# Altium PCB 1H-WSL007-2-1.PcbDoc (part 2 of 4)
Units mil, origin at the board's own origin, x right, y up, seen from the top; angles counter-clockwise.
Board outline 6030 x 4220 mil, 4 copper layers (Top Layer, Mid-Layer 1, Mid-Layer 2, Bottom Layer), stack 90.192 mil thick; 369 components, 15 nets, 801 pads, 1963 vias.
Unrouted connection lines stored in the file: 45.
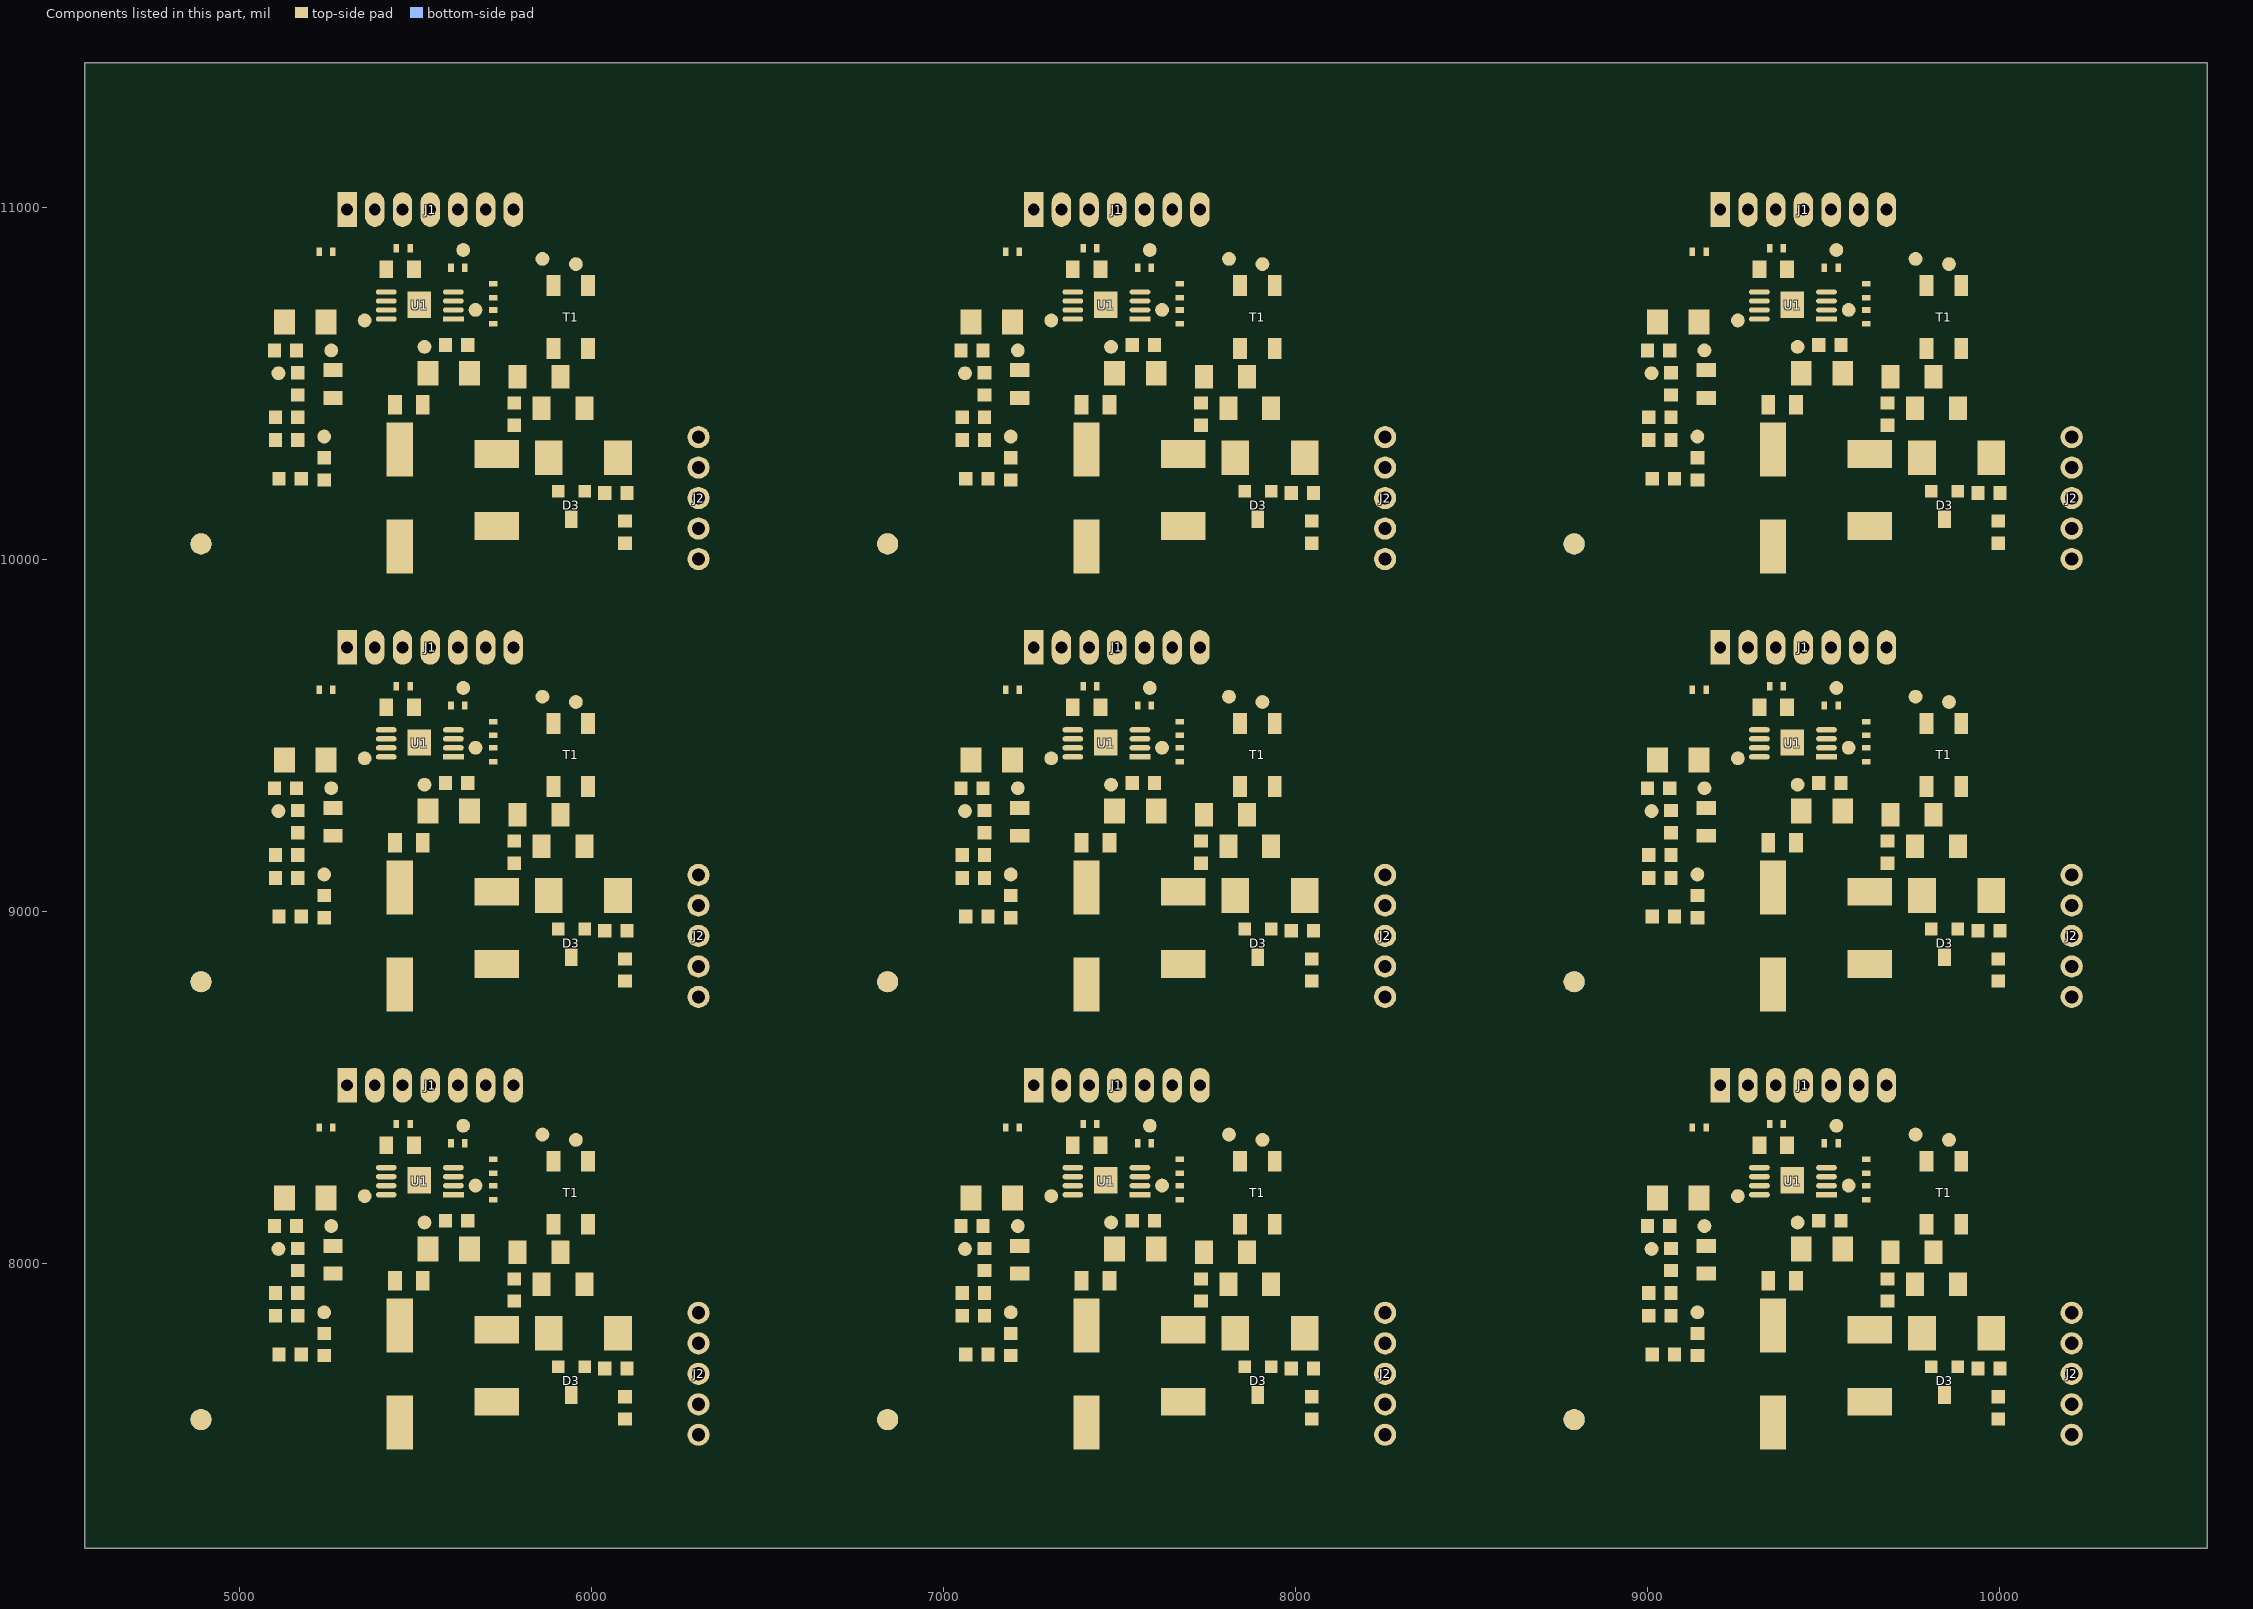
[diagram p4: the components of this part, seen from the top]

## Via types
v1: diameter 24, hole 12, Top Layer to Bottom Layer, tented both sides, 1918 vias
v2: diameter 16, hole 8, Top Layer to Bottom Layer, tented both sides, 45 vias

## Nets (pads, with @x,y where several pads share a name; then routed paths per layer and width w, separated by ;. In a path a pad name is that pad's centre, name@x,y a point inside that pad or via, vN(x,y) a via of type N, cw(c..) or ccw(c..) an arc to the next point about the centre after c; other vN are vias at no path point) (continued)
copper on no net: | length 56193.4
  Top Layer w10: 5111.5,8041.5 5165,8041.5 5161.5,8045 5161.5,8105.98 5175,8119.49 5175,8291.38 5264.69,8381.06 5264.69,8385 5264.69,8442.99 5282.48,8460.79 5305.04,8483.35 5305.04,8505 ; 5111.5,9285.59 5165,9285.59 5161.5,9289.09 5161.5,9350.08 5175,9363.58 5175,9535.47 5264.69,9625.16 5264.69,9629.09 5264.69,9687.09 5282.48,9704.88 5305.04,9727.44 5305.04,9749.09 ; 5111.5,10529.68 5165,10529.68 5161.5,10533.19 5161.5,10594.17 5175,10607.67 5175,10779.56 5264.69,10869.25 5264.69,10873.19 5264.69,10931.18 5282.48,10948.97 5305.04,10971.53 5305.04,10993.19 ; 5175,7740 5237.01,7740 5240,7737.01 ; 5175,8984.09 5237.01,8984.09 5240,8981.1 ; 5175,10228.19 5237.01,10228.19 5240,10225.19 ; 5240,7800 5240,7860 5175,7860 5165,7850 5165,7915 5165,7980 5175,7970 5265,7970 ; 5240,9044.09 5240,9104.09 5175,9104.09 5165,9094.09 5165,9159.09 5165,9224.09 5175,9214.09 5265,9214.09 ; 5240,10288.19 5240,10348.19 5175,10348.19 5165,10338.19 5165,10403.19 5165,10468.19 5175,10458.19 5265,10458.19 ; 5607.03,8219.71 5607.17,8219.85 5669.85,8219.85 5670,8220 5717.44,8220 5720,8222.56 5720,8255 ; 5607.03,9463.8 5607.17,9463.95 5669.85,9463.95 5670,9464.09 5717.44,9464.09 5720,9466.65 5720,9499.09 ; 5607.03,10707.89 5607.17,10708.04 5669.85,10708.04 5670,10708.19 5717.44,10708.19 5720,10710.75 5720,10743.19 ; 5620,8505 5620,8471.14 5635,8456.14 5635,8390 5637.34,8387.66 5637.34,8342.34 5639.69,8340 5670.43,8340 5716.06,8294.37 5720,8294.37 ; 5620,9749.09 5620,9715.23 5635,9700.23 5635,9634.09 5637.34,9631.75 5637.34,9586.44 5639.69,9584.09 5670.43,9584.09 5716.06,9538.46 5720,9538.46 ; 5620,10993.19 5620,10959.32 5635,10944.32 5635,10878.19 5637.34,10875.84 5637.34,10830.53 5639.69,10828.19 5670.43,10828.19 5716.06,10782.56 5720,10782.56 ; 5698.74,8505 5698.74,8483.35 5797.09,8385 5866.56,8385 5906.26,8345.3 5906.26,8303.82 5891.57,8289.13 ; 5698.74,9749.09 5698.74,9727.44 5797.09,9629.09 5866.56,9629.09 5906.26,9589.39 5906.26,9547.91 5891.57,9533.23 ; 5698.74,10993.19 5698.74,10971.53 5797.09,10873.19 5866.56,10873.19 5906.26,10833.48 5906.26,10792.01 5891.57,10777.32 ; 5777.48,8505 5784.66,8497.82 5784.66,8425.34 5805,8405 5874.13,8405 5965.47,8313.66 5975.31,8313.66 5990,8298.98 5990,8289.13 ; 5777.48,9749.09 5784.66,9741.91 5784.66,9669.43 5805,9649.09 5874.13,9649.09 5965.47,9557.75 5975.31,9557.75 5990,9543.07 5990,9533.23 ; 5777.48,10993.19 5784.66,10986.01 5784.66,10913.53 5805,10893.19 5874.13,10893.19 5965.47,10801.85 5975.31,10801.85 5990,10787.16 5990,10777.32 ; 5788.98,8030 5780,8021.02 5780,7955 5842.95,7955 5857.95,7940 ; 5788.98,9274.09 5780,9265.12 5780,9199.09 5842.95,9199.09 5857.95,9184.09 ; 5788.98,10518.19 5780,10509.21 5780,10443.19 5842.95,10443.19 5857.95,10428.19 ; 5891.57,8110 5891.57,8100.16 5919.13,8072.61 5919.13,8038.1 5911.02,8030 ; 5891.57,9354.09 5891.57,9344.25 5919.13,9316.7 5919.13,9282.2 5911.02,9274.09 ; 5891.57,10598.19 5891.57,10588.34 5919.13,10560.79 5919.13,10526.29 5911.02,10518.19 ; 5905,8030 5905,8028.15 5931.61,8001.54 5933.46,8001.54 5939.91,7995.09 5939.91,7900.53 5940.5,7899.94 5940.5,7740.5 5905,7705 5944.19,7665.81 6039.19,7665.81 6065,7640 6262.2,7640 6303.54,7598.66 ; 5905,9274.09 5905,9272.24 5931.61,9245.63 5933.46,9245.63 5939.91,9239.18 5939.91,9144.62 5940.5,9144.03 5940.5,8984.59 5905,8949.09 5944.19,8909.91 6039.19,8909.91 6065,8884.09 6262.2,8884.09 6303.54,8842.75 ; 5905,10518.19 5905,10516.34 5931.61,10489.72 5933.46,10489.72 5939.91,10483.28 5939.91,10388.72 5940.5,10388.13 5940.5,10228.69 5905,10193.19 5944.19,10154 6039.19,10154 6065,10128.19 6262.2,10128.19 6303.54,10086.85 ; 5990,8110 5990,8100.16 5959.41,8069.57 5959.41,7960.59 5980,7940 5960,7920 5960,7730 5990,7700 6037.01,7700 6037.01,7699.02 6050.71,7685.31 6051.69,7685.31 6077.01,7660 6265,7660 6290.28,7685.28 6303.54,7685.28 ; 5990,9354.09 5990,9344.25 5959.41,9313.66 5959.41,9204.68 5980,9184.09 5960,9164.09 5960,8974.09 5990,8944.09 6037.01,8944.09 6037.01,8943.11 6050.71,8929.41 6051.69,8929.41 6077.01,8904.09 6265,8904.09 6290.28,8929.37 6303.54,8929.37 ; 5990,10598.19 5990,10588.34 5959.41,10557.75 5959.41,10448.78 5980,10428.19 5960,10408.19 5960,10218.19 5990,10188.19 6037.01,10188.19 6037.01,10187.2 6050.71,10173.5 6051.69,10173.5 6077.01,10148.19 6265,10148.19 6290.28,10173.46 6303.54,10173.46 ; 7062.28,8041.5 7115.79,8041.5 7112.28,8045 7112.28,8105.98 7125.79,8119.49 7125.79,8291.38 7215.47,8381.06 7215.47,8385 7215.47,8442.99 7233.27,8460.79 7255.83,8483.35 7255.83,8505 ; 7062.28,9285.59 7115.79,9285.59 7112.28,9289.09 7112.28,9350.08 7125.79,9363.58 7125.79,9535.47 7215.47,9625.16 7215.47,9629.09 7215.47,9687.09 7233.27,9704.88 7255.83,9727.44 7255.83,9749.09 ; 7062.28,10529.68 7115.79,10529.68 7112.28,10533.19 7112.28,10594.17 7125.79,10607.68 7125.79,10779.56 7215.47,10869.25 7215.47,10873.19 7215.47,10931.18 7233.27,10948.97 7255.83,10971.53 7255.83,10993.19 ; 7125.79,7740 7187.8,7740 7190.79,7737.01 ; 7125.79,8984.09 7187.8,8984.09 7190.79,8981.1 ; 7125.79,10228.19 7187.8,10228.19 7190.79,10225.19 ; 7190.79,7800 7190.79,7860 7125.79,7860 7115.79,7850 7115.79,7915 7115.79,7980 7125.79,7970 7215.79,7970 ; 7190.79,9044.09 7190.79,9104.09 7125.79,9104.09 7115.79,9094.09 7115.79,9159.09 7115.79,9224.09 7125.79,9214.09 7215.79,9214.09 ; 7190.79,10288.19 7190.79,10348.19 7125.79,10348.19 7115.79,10338.19 7115.79,10403.19 7115.79,10468.19 7125.79,10458.19 7215.79,10458.19 ; 7557.81,8219.71 7557.96,8219.85 7620.64,8219.85 7620.79,8220 7668.23,8220 7670.79,8222.56 7670.79,8255 ; 7557.81,9463.8 7557.96,9463.95 7620.64,9463.95 7620.79,9464.09 7668.23,9464.09 7670.79,9466.65 7670.79,9499.09 ; 7557.81,10707.89 7557.96,10708.04 7620.64,10708.04 7620.79,10708.19 7668.23,10708.19 7670.79,10710.75 7670.79,10743.19 ; 7570.79,8505 7570.79,8471.14 7585.79,8456.14 7585.79,8390 7588.13,8387.66 7588.13,8342.34 7590.47,8340 7621.22,8340 7666.85,8294.37 7670.79,8294.37 ; 7570.79,9749.09 7570.79,9715.23 7585.79,9700.23 7585.79,9634.09 7588.13,9631.75 7588.13,9586.44 7590.47,9584.09 7621.22,9584.09 7666.85,9538.46 7670.79,9538.46 ; 7570.79,10993.19 7570.79,10959.32 7585.79,10944.32 7585.79,10878.19 7588.13,10875.84 7588.13,10830.53 7590.47,10828.19 7621.22,10828.19 7666.85,10782.56 7670.79,10782.56 ; 7649.53,8505 7649.53,8483.35 7747.87,8385 7817.34,8385 7857.05,8345.3 7857.05,8303.82 7842.36,8289.13 ; 7649.53,9749.09 7649.53,9727.44 7747.87,9629.09 7817.34,9629.09 7857.05,9589.39 7857.05,9547.91 7842.36,9533.23 ; 7649.53,10993.19 7649.53,10971.53 7747.87,10873.19 7817.34,10873.19 7857.05,10833.48 7857.05,10792.01 7842.36,10777.32 ; 7728.27,8505 7735.45,8497.82 7735.45,8425.34 7755.79,8405 7824.92,8405 7916.26,8313.66 7926.1,8313.66 7940.79,8298.98 7940.79,8289.13 ; 7728.27,9749.09 7735.45,9741.91 7735.45,9669.43 7755.79,9649.09 7824.92,9649.09 7916.26,9557.75 7926.1,9557.75 7940.79,9543.07 7940.79,9533.23 ; 7728.27,10993.19 7735.45,10986.01 7735.45,10913.53 7755.79,10893.19 7824.92,10893.19 7916.26,10801.85 7926.1,10801.85 7940.79,10787.16 7940.79,10777.32 ; 7739.76,8030 7730.79,8021.02 7730.79,7955 7793.74,7955 7808.74,7940 ; 7739.76,9274.09 7730.79,9265.12 7730.79,9199.09 7793.74,9199.09 7808.74,9184.09 ; 7739.76,10518.19 7730.79,10509.21 7730.79,10443.19 7793.74,10443.19 7808.74,10428.19 ; 7842.36,8110 7842.36,8100.16 7869.91,8072.61 7869.91,8038.1 7861.81,8030 ; 7842.36,9354.09 7842.36,9344.25 7869.91,9316.7 7869.91,9282.2 7861.81,9274.09 ; 7842.36,10598.19 7842.36,10588.34 7869.91,10560.79 7869.91,10526.29 7861.81,10518.19 ; 7855.79,8030 7855.79,8028.15 7882.4,8001.54 7884.25,8001.54 7890.7,7995.09 7890.7,7900.53 7891.29,7899.94 7891.29,7740.5 7855.79,7705 7894.97,7665.81 7989.97,7665.81 8015.79,7640 8212.99,7640 8254.33,7598.66 ; 7855.79,9274.09 7855.79,9272.24 7882.4,9245.63 7884.25,9245.63 7890.7,9239.18 7890.7,9144.62 7891.29,9144.03 7891.29,8984.59 7855.79,8949.09 7894.97,8909.91 7989.97,8909.91 8015.79,8884.09 8212.99,8884.09 8254.33,8842.75 ; 7855.79,10518.19 7855.79,10516.34 7882.4,10489.72 7884.25,10489.72 7890.7,10483.28 7890.7,10388.72 7891.29,10388.13 7891.29,10228.69 7855.79,10193.19 7894.97,10154 7989.97,10154 8015.79,10128.19 8212.99,10128.19 8254.33,10086.85 ; 7940.79,8110 7940.79,8100.16 7910.2,8069.57 7910.2,7960.59 7930.79,7940 7910.79,7920 7910.79,7730 7940.79,7700 7987.8,7700 7987.8,7699.02 8001.5,7685.31 8002.48,7685.31 8027.8,7660 8215.79,7660 8241.06,7685.28 8254.33,7685.28 ; 7940.79,9354.09 7940.79,9344.25 7910.2,9313.66 7910.2,9204.68 7930.79,9184.09 7910.79,9164.09 7910.79,8974.09 7940.79,8944.09 7987.8,8944.09 7987.8,8943.11 8001.5,8929.41 8002.48,8929.41 8027.8,8904.09 8215.79,8904.09 8241.06,8929.37 8254.33,8929.37 ; 7940.79,10598.19 7940.79,10588.34 7910.2,10557.75 7910.2,10448.78 7930.79,10428.19 7910.79,10408.19 7910.79,10218.19 7940.79,10188.19 7987.8,10188.19 7987.8,10187.2 8001.5,10173.5 8002.48,10173.5 8027.8,10148.19 8215.79,10148.19 8241.06,10173.46 8254.33,10173.46 ; 9013.07,8041.5 9066.57,8041.5 9063.07,8045 9063.07,8105.98 9076.57,8119.49 9076.57,8291.38 9166.26,8381.06 9166.26,8385 9166.26,8442.99 9184.06,8460.79 9206.61,8483.35 9206.61,8505 ; 9013.07,9285.59 9066.57,9285.59 9063.07,9289.09 9063.07,9350.08 9076.57,9363.58 9076.57,9535.47 9166.26,9625.16 9166.26,9629.09 9166.26,9687.09 9184.06,9704.88 9206.61,9727.44 9206.61,9749.09 ; 9013.07,10529.68 9066.57,10529.68 9063.07,10533.19 9063.07,10594.17 9076.57,10607.68 9076.57,10779.56 9166.26,10869.25 9166.26,10873.19 9166.26,10931.18 9184.06,10948.97 9206.61,10971.53 9206.61,10993.19 ; 9076.57,7740 9138.58,7740 9141.57,7737.01 ; 9076.57,8984.09 9138.58,8984.09 9141.57,8981.1 ; 9076.57,10228.19 9138.58,10228.19 9141.57,10225.19 ; 9141.57,7800 9141.57,7860 9076.57,7860 9066.57,7850 9066.57,7915 9066.57,7980 9076.57,7970 9166.57,7970 ; 9141.57,9044.09 9141.57,9104.09 9076.57,9104.09 9066.57,9094.09 9066.57,9159.09 9066.57,9224.09 9076.57,9214.09 9166.57,9214.09 ; 9141.57,10288.19 9141.57,10348.19 9076.57,10348.19 9066.57,10338.19 9066.57,10403.19 9066.57,10468.19 9076.57,10458.19 9166.57,10458.19 ; 9508.6,8219.71 9508.75,8219.85 9571.43,8219.85 9571.57,8220 9619.02,8220 9621.57,8222.56 9621.57,8255 ; 9508.6,9463.8 9508.75,9463.95 9571.43,9463.95 9571.57,9464.09 9619.02,9464.09 9621.57,9466.65 9621.57,9499.09 ; 9508.6,10707.89 9508.75,10708.04 9571.43,10708.04 9571.57,10708.19 9619.02,10708.19 9621.57,10710.75 9621.57,10743.19 ; 9521.57,8505 9521.57,8471.14 9536.57,8456.14 9536.57,8390 9538.92,8387.66 9538.92,8342.34 9541.26,8340 9572.01,8340 9617.64,8294.37 9621.57,8294.37 ; 9521.57,9749.09 9521.57,9715.23 9536.57,9700.23 9536.57,9634.09 9538.92,9631.75 9538.92,9586.44 9541.26,9584.09 9572.01,9584.09 9617.64,9538.46 9621.57,9538.46 ; 9521.57,10993.19 9521.57,10959.32 9536.57,10944.32 9536.57,10878.19 9538.92,10875.84 9538.92,10830.53 9541.26,10828.19 9572.01,10828.19 9617.64,10782.56 9621.57,10782.56 ; 9600.32,8505 9600.32,8483.35 9698.66,8385 9768.13,8385 9807.83,8345.3 9807.83,8303.82 9793.15,8289.13 ; 9600.32,9749.09 9600.32,9727.44 9698.66,9629.09 9768.13,9629.09 9807.83,9589.39 9807.83,9547.91 9793.15,9533.23 ; 9600.32,10993.19 9600.32,10971.53 9698.66,10873.19 9768.13,10873.19 9807.83,10833.48 9807.83,10792.01 9793.15,10777.32 ; 9679.06,8505 9686.24,8497.82 9686.24,8425.34 9706.57,8405 9775.71,8405 9867.05,8313.66 9876.89,8313.66 9891.57,8298.98 9891.57,8289.13 ; 9679.06,9749.09 9686.24,9741.91 9686.24,9669.43 9706.57,9649.09 9775.71,9649.09 9867.05,9557.75 9876.89,9557.75 9891.57,9543.07 9891.57,9533.23 ; 9679.06,10993.19 9686.24,10986.01 9686.24,10913.53 9706.57,10893.19 9775.71,10893.19 9867.05,10801.85 9876.89,10801.85 9891.57,10787.16 9891.57,10777.32 ; 9690.55,8030 9681.57,8021.02 9681.57,7955 9744.53,7955 9759.53,7940 ; 9690.55,9274.09 9681.57,9265.12 9681.57,9199.09 9744.53,9199.09 9759.53,9184.09 ; 9690.55,10518.19 9681.57,10509.21 9681.57,10443.19 9744.53,10443.19 9759.53,10428.19 ; 9793.15,8110 9793.15,8100.16 9820.7,8072.61 9820.7,8038.1 9812.6,8030 ; 9793.15,9354.09 9793.15,9344.25 9820.7,9316.7 9820.7,9282.2 9812.6,9274.09 ; 9793.15,10598.19 9793.15,10588.34 9820.7,10560.79 9820.7,10526.29 9812.6,10518.19 ; 9806.57,8030 9806.57,8028.15 9833.19,8001.54 9835.04,8001.54 9841.48,7995.09 9841.48,7900.53 9842.07,7899.94 9842.07,7740.5 9806.57,7705 9845.76,7665.81 9940.76,7665.81 9966.57,7640 10163.78,7640 10205.12,7598.66 ; 9806.57,9274.09 9806.57,9272.24 9833.19,9245.63 9835.04,9245.63 9841.48,9239.18 9841.48,9144.62 9842.07,9144.03 9842.07,8984.59 9806.57,8949.09 9845.76,8909.91 9940.76,8909.91 9966.57,8884.09 10163.78,8884.09 10205.12,8842.75 ; 9806.57,10518.19 9806.57,10516.34 9833.19,10489.72 9835.04,10489.72 9841.48,10483.28 9841.48,10388.72 9842.07,10388.13 9842.07,10228.69 9806.57,10193.19 9845.76,10154 9940.76,10154 9966.57,10128.19 10163.78,10128.19 10205.12,10086.85 ; 9891.57,8110 9891.57,8100.16 9860.98,8069.57 9860.98,7960.59 9881.57,7940 9861.57,7920 9861.57,7730 9891.57,7700 9938.58,7700 9938.58,7699.02 9952.28,7685.31 9953.27,7685.31 9978.58,7660 10166.57,7660 10191.85,7685.28 10205.12,7685.28 ; 9891.57,9354.09 9891.57,9344.25 9860.98,9313.66 9860.98,9204.68 9881.57,9184.09 9861.57,9164.09 9861.57,8974.09 9891.57,8944.09 9938.58,8944.09 9938.58,8943.11 9952.28,8929.41 9953.27,8929.41 9978.58,8904.09 10166.57,8904.09 10191.85,8929.37 10205.12,8929.37 ; 9891.57,10598.19 9891.57,10588.34 9860.98,10557.75 9860.98,10448.78 9881.57,10428.19 9861.57,10408.19 9861.57,10218.19 9891.57,10188.19 9938.58,10188.19 9938.58,10187.2 9952.28,10173.5 9953.27,10173.5 9978.58,10148.19 10166.57,10148.19 10191.85,10173.46 10205.12,10173.46
  Top Layer w15: 5416.28,8194.1 5359.1,8194.1 5355,8190 5355,8268.82 5416.26,8330.08 5416.26,8339.92 5445.31,8368.98 5445.31,8455.29 5462.52,8472.49 5462.52,8505 ; 5416.28,9438.19 5359.1,9438.19 5355,9434.09 5355,9512.91 5416.26,9574.17 5416.26,9584.01 5445.31,9613.07 5445.31,9699.38 5462.52,9716.58 5462.52,9749.09 ; 5416.28,10682.28 5359.1,10682.28 5355,10678.19 5355,10757.01 5416.26,10818.27 5416.26,10828.11 5445.31,10857.16 5445.31,10943.47 5462.52,10960.68 5462.52,10993.19 ; 7367.07,8194.1 7309.89,8194.1 7305.79,8190 7305.79,8268.82 7367.05,8330.08 7367.05,8339.92 7396.1,8368.98 7396.1,8455.29 7413.31,8472.49 7413.31,8505 ; 7367.07,9438.19 7309.89,9438.19 7305.79,9434.09 7305.79,9512.91 7367.05,9574.17 7367.05,9584.01 7396.1,9613.07 7396.1,9699.38 7413.31,9716.58 7413.31,9749.09 ; 7367.07,10682.28 7309.89,10682.28 7305.79,10678.19 7305.79,10757.01 7367.05,10818.27 7367.05,10828.11 7396.1,10857.16 7396.1,10943.47 7413.31,10960.68 7413.31,10993.19 ; 9317.86,8194.1 9260.67,8194.1 9256.57,8190 9256.57,8268.82 9317.83,8330.08 9317.83,8339.92 9346.89,8368.98 9346.89,8455.29 9364.09,8472.49 9364.09,8505 ; 9317.86,9438.19 9260.67,9438.19 9256.57,9434.09 9256.57,9512.91 9317.83,9574.17 9317.83,9584.01 9346.89,9613.07 9346.89,9699.38 9364.09,9716.58 9364.09,9749.09 ; 9317.86,10682.28 9260.67,10682.28 9256.57,10678.19 9256.57,10757.01 9317.83,10818.27 9317.83,10828.11 9346.89,10857.16 9346.89,10943.47 9364.09,10960.68 9364.09,10993.19
  Top Layer w20: 5265,8048.74 5262.5,8051.24 5262.5,8102.5 5260,8105 5256.29,8108.71 5256.29,8173.71 5245,8185 5245,8260 5340,8355 5340,8430 5367.86,8457.86 5367.86,8457.93 5383.78,8473.84 5383.78,8505 ; 5265,9292.83 5262.5,9295.33 5262.5,9346.59 5260,9349.09 5256.29,9352.8 5256.29,9417.8 5245,9429.09 5245,9504.09 5340,9599.09 5340,9674.09 5367.86,9701.96 5367.86,9702.02 5383.78,9717.94 5383.78,9749.09 ; 5265,10536.93 5262.5,10539.43 5262.5,10590.69 5260,10593.19 5256.29,10596.89 5256.29,10661.89 5245,10673.19 5245,10748.19 5340,10843.19 5340,10918.19 5367.86,10946.05 5367.86,10946.11 5383.78,10962.03 5383.78,10993.19 ; 5520,7950 5527.5,7957.5 5527.5,8032.5 5535,8040 5528.71,8046.29 5528.71,8111.29 5525,8115 5527.5,8117.5 5582.5,8117.5 5585,8120 5585,8120.98 5607.03,8143.01 5607.03,8191.6 ; 5520,9194.09 5527.5,9201.59 5527.5,9276.59 5535,9284.09 5528.71,9290.39 5528.71,9355.39 5525,9359.09 5527.5,9361.59 5582.5,9361.59 5585,9364.09 5585,9365.08 5607.03,9387.1 5607.03,9435.69 ; 5520,10438.19 5527.5,10445.69 5527.5,10520.69 5535,10528.19 5528.71,10534.48 5528.71,10599.48 5525,10603.19 5527.5,10605.69 5582.5,10605.69 5585,10608.19 5585,10609.17 5607.03,10631.2 5607.03,10679.78 ; 7215.79,8048.74 7213.29,8051.24 7213.29,8102.5 7210.79,8105 7207.08,8108.71 7207.08,8173.71 7195.79,8185 7195.79,8260 7290.79,8355 7290.79,8430 7318.65,8457.86 7318.65,8457.93 7334.57,8473.84 7334.57,8505 ; 7215.79,9292.83 7213.29,9295.33 7213.29,9346.59 7210.79,9349.09 7207.08,9352.8 7207.08,9417.8 7195.79,9429.09 7195.79,9504.09 7290.79,9599.09 7290.79,9674.09 7318.65,9701.96 7318.65,9702.02 7334.57,9717.94 7334.57,9749.09 ; 7215.79,10536.93 7213.29,10539.43 7213.29,10590.69 7210.79,10593.19 7207.08,10596.89 7207.08,10661.89 7195.79,10673.19 7195.79,10748.19 7290.79,10843.19 7290.79,10918.19 7318.65,10946.05 7318.65,10946.11 7334.57,10962.03 7334.57,10993.19 ; 7470.79,7950 7478.29,7957.5 7478.29,8032.5 7485.79,8040 7479.49,8046.29 7479.49,8111.29 7475.79,8115 7478.29,8117.5 7533.29,8117.5 7535.79,8120 7535.79,8120.98 7557.81,8143.01 7557.81,8191.6 ; 7470.79,9194.09 7478.29,9201.59 7478.29,9276.59 7485.79,9284.09 7479.49,9290.39 7479.49,9355.39 7475.79,9359.09 7478.29,9361.59 7533.29,9361.59 7535.79,9364.09 7535.79,9365.08 7557.81,9387.1 7557.81,9435.69 ; 7470.79,10438.19 7478.29,10445.69 7478.29,10520.69 7485.79,10528.19 7479.49,10534.48 7479.49,10599.48 7475.79,10603.19 7478.29,10605.69 7533.29,10605.69 7535.79,10608.19 7535.79,10609.17 7557.81,10631.2 7557.81,10679.78 ; 9166.57,8048.74 9164.07,8051.24 9164.07,8102.5 9161.57,8105 9157.87,8108.71 9157.87,8173.71 9146.57,8185 9146.57,8260 9241.57,8355 9241.57,8430 9269.44,8457.86 9269.44,8457.93 9285.35,8473.84 9285.35,8505 ; 9166.57,9292.83 9164.07,9295.33 9164.07,9346.59 9161.57,9349.09 9157.87,9352.8 9157.87,9417.8 9146.57,9429.09 9146.57,9504.09 9241.57,9599.09 9241.57,9674.09 9269.44,9701.96 9269.44,9702.02 9285.35,9717.94 9285.35,9749.09 ; 9166.57,10536.93 9164.07,10539.43 9164.07,10590.69 9161.57,10593.19 9157.87,10596.89 9157.87,10661.89 9146.57,10673.19 9146.57,10748.19 9241.57,10843.19 9241.57,10918.19 9269.44,10946.05 9269.44,10946.11 9285.35,10962.03 9285.35,10993.19 ; 9421.57,7950 9429.07,7957.5 9429.07,8032.5 9436.57,8040 9430.28,8046.29 9430.28,8111.29 9426.57,8115 9429.07,8117.5 9484.07,8117.5 9486.57,8120 9486.57,8120.98 9508.6,8143.01 9508.6,8191.6 ; 9421.57,9194.09 9429.07,9201.59 9429.07,9276.59 9436.57,9284.09 9430.28,9290.39 9430.28,9355.39 9426.57,9359.09 9429.07,9361.59 9484.07,9361.59 9486.57,9364.09 9486.57,9365.08 9508.6,9387.1 9508.6,9435.69 ; 9421.57,10438.19 9429.07,10445.69 9429.07,10520.69 9436.57,10528.19 9430.28,10534.48 9430.28,10599.48 9426.57,10603.19 9429.07,10605.69 9484.07,10605.69 9486.57,10608.19 9486.57,10609.17 9508.6,10631.2 9508.6,10679.78
  Top Layer w30: 5265,7970 5421.26,7970 5428.7,7962.56 5436.57,7962.56 5441.26,7957.87 5441.26,7950 5445.94,7945.31 5445.94,7831.85 5455,7822.8 5467.26,7810.53 5730.15,7810.53 5867.62,7810.53 5878.15,7800 ; 5265,9214.09 5421.26,9214.09 5428.7,9206.65 5436.57,9206.65 5441.26,9201.97 5441.26,9194.09 5445.94,9189.41 5445.94,9075.94 5455,9066.89 5467.26,9054.63 5730.15,9054.63 5867.62,9054.63 5878.15,9044.09 ; 5265,10458.19 5421.26,10458.19 5428.7,10450.75 5436.57,10450.75 5441.26,10446.06 5441.26,10438.19 5445.94,10433.5 5445.94,10320.04 5455,10310.98 5467.26,10298.72 5730.15,10298.72 5867.62,10298.72 5878.15,10288.19 ; 6075,7800 6075,7796.26 6099.37,7771.89 6303.54,7771.89 ; 6075,9044.09 6075,9040.35 6099.37,9015.98 6303.54,9015.98 ; 6075,10288.19 6075,10284.45 6099.37,10260.08 6303.54,10260.08 ; 7215.79,7970 7372.05,7970 7379.49,7962.56 7387.36,7962.56 7392.05,7957.87 7392.05,7950 7396.73,7945.31 7396.73,7831.85 7405.79,7822.8 7418.05,7810.53 7680.94,7810.53 7818.4,7810.53 7828.94,7800 ; 7215.79,9214.09 7372.05,9214.09 7379.49,9206.65 7387.36,9206.65 7392.05,9201.97 7392.05,9194.09 7396.73,9189.41 7396.73,9075.94 7405.79,9066.89 7418.05,9054.63 7680.94,9054.63 7818.4,9054.63 7828.94,9044.09 ; 7215.79,10458.19 7372.05,10458.19 7379.49,10450.75 7387.36,10450.75 7392.05,10446.06 7392.05,10438.19 7396.73,10433.5 7396.73,10320.04 7405.79,10310.98 7418.05,10298.72 7680.94,10298.72 7818.4,10298.72 7828.94,10288.19 ; 8025.79,7800 8025.79,7796.26 8050.16,7771.89 8254.33,7771.89 ; 8025.79,9044.09 8025.79,9040.35 8050.16,9015.98 8254.33,9015.98 ; 8025.79,10288.19 8025.79,10284.45 8050.16,10260.08 8254.33,10260.08 ; 9166.57,7970 9322.83,7970 9330.28,7962.56 9338.15,7962.56 9342.83,7957.87 9342.83,7950 9347.52,7945.31 9347.52,7831.85 9356.57,7822.8 9368.84,7810.53 9631.72,7810.53 9769.19,7810.53 9779.72,7800 ; 9166.57,9214.09 9322.83,9214.09 9330.28,9206.65 9338.15,9206.65 9342.83,9201.97 9342.83,9194.09 9347.52,9189.41 9347.52,9075.94 9356.57,9066.89 9368.84,9054.63 9631.72,9054.63 9769.19,9054.63 9779.72,9044.09 ; 9166.57,10458.19 9322.83,10458.19 9330.28,10450.75 9338.15,10450.75 9342.83,10446.06 9342.83,10438.19 9347.52,10433.5 9347.52,10320.04 9356.57,10310.98 9368.84,10298.72 9631.72,10298.72 9769.19,10298.72 9779.72,10288.19 ; 9976.57,7800 9976.57,7796.26 10000.94,7771.89 10205.12,7771.89 ; 9976.57,9044.09 9976.57,9040.35 10000.94,9015.98 10205.12,9015.98 ; 9976.57,10288.19 9976.57,10284.45 10000.94,10260.08 10205.12,10260.08